# Allegro board es1_blank_output1.brd
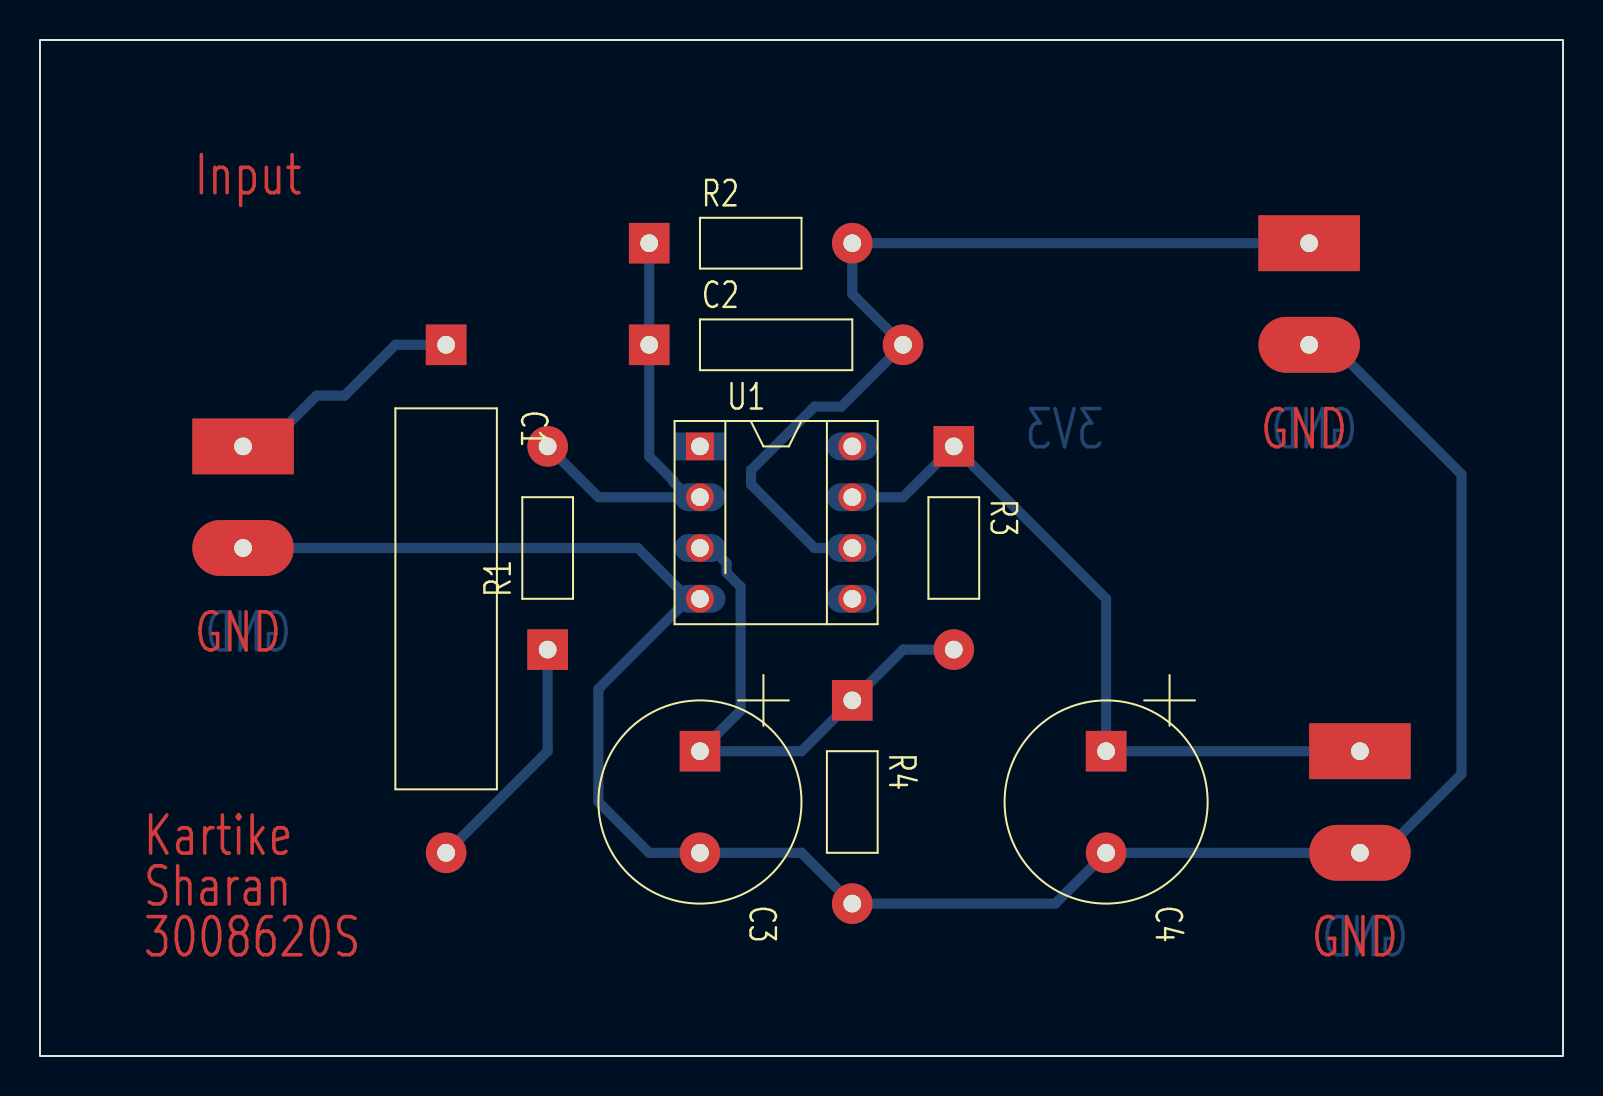
[diagram p0: board, top side]
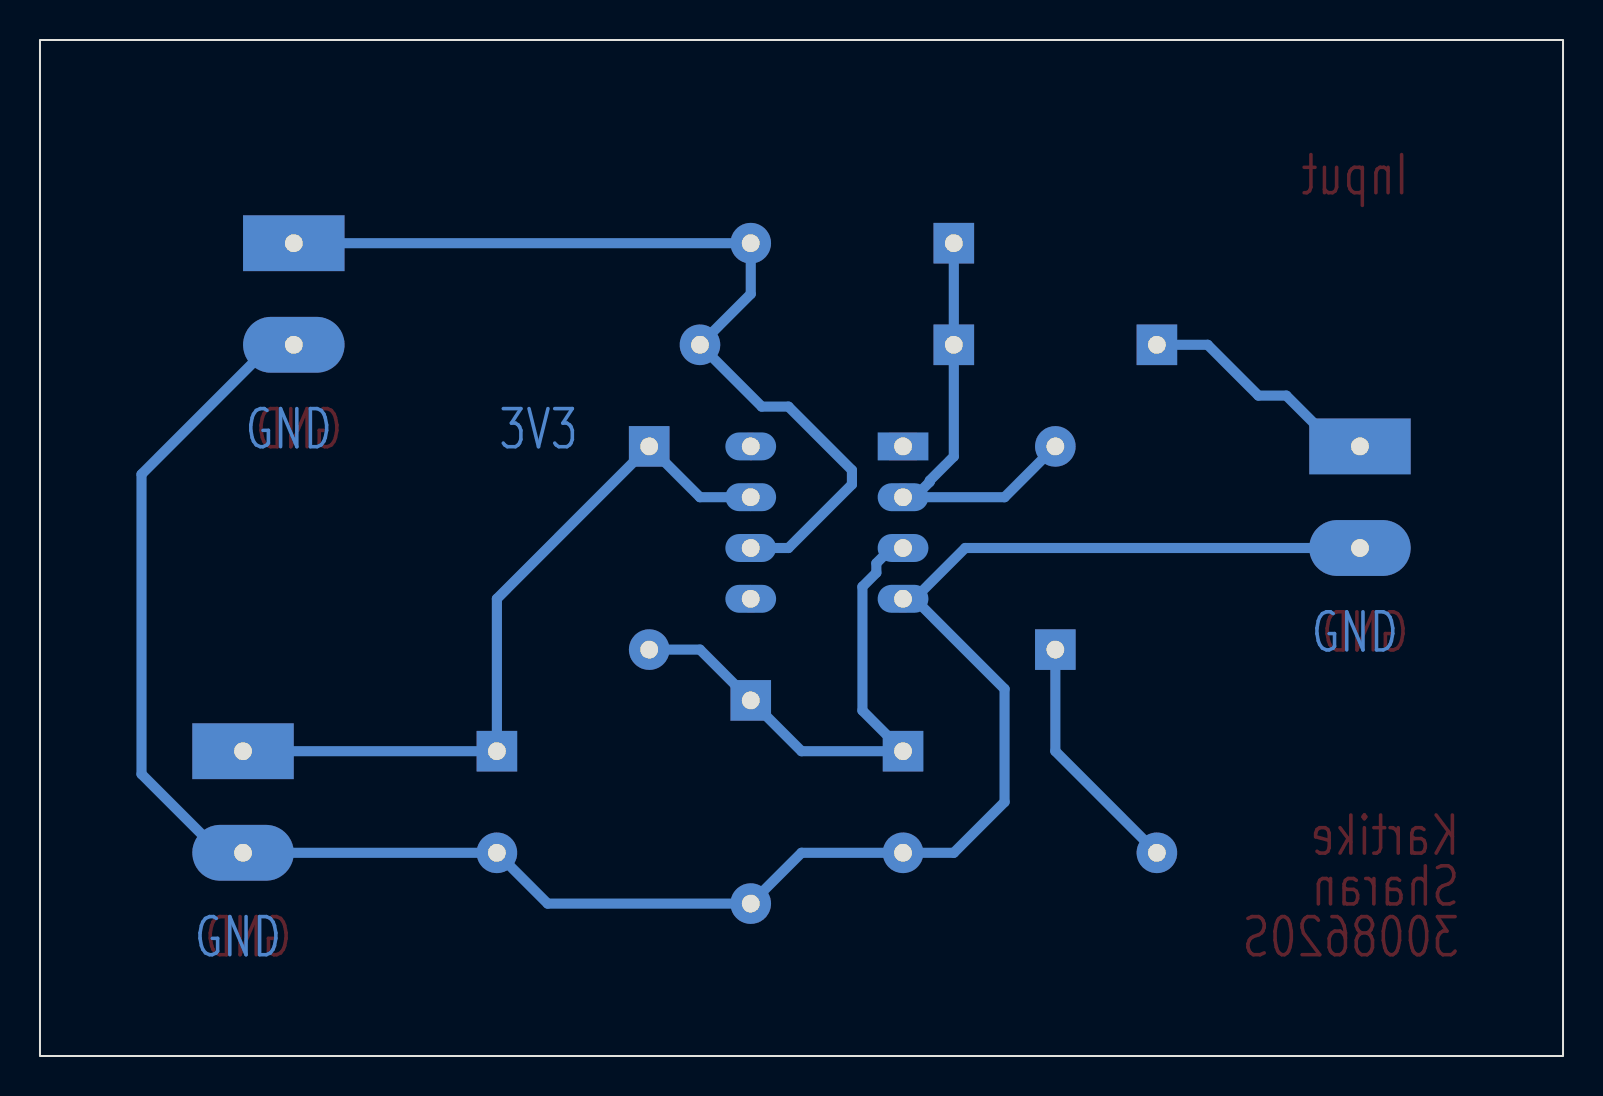
[diagram p1: board, bottom side, seen from below]

Outline 76.2 x 50.8 mm; copper layers: TOP, BOTTOM. Coordinates in mm from the lower left corner of the outline.
Outline path: rectangle 0,0 76.2,50.8

## Design rules (mm)
constraint set DEFAULT: min track width 0.508

## Placement (name value [footprint] x y rotation side)
C1  1u  [GU-RC1000]  20.32 35.56 270 top
C2  10n  [GU-RC500]  30.48 35.56 0 top
C3  4u7  [GU-CAPCYL200]  33.02 15.24 270 top
C4  4u7  [GU-CAPCYL200]  53.34 15.24 270 top
J1  CON2  [GU-TERMINAL2-200]  10.16 30.48 0 top
J2  CON2  [GU-TERMINAL2-200]  63.5 40.64 0 top
J3  CON2  [GU-TERMINAL2-200]  66.04 15.24 0 top
R1  330k  [GU-RC400]  25.4 20.32 90 top
R2  2000k  [GU-RC400]  30.48 40.64 0 top
R3  1k  [GU-RC400]  45.72 30.48 270 top
R4  1k  [GU-RC400]  40.64 17.78 270 top
U1  MCP6291  [GU-DIPSOCK8]  33.02 30.48 0 top

## Library data of the parts
C1 = CAP NP 1u
C2 = CAP NP 10n
C3 C4 = CAP POL 4u7
J1-J3 = CON2: User Part Number: TERMINAL2-200
R1 = Resistor 330k
R2 = Resistor 2000k
R3 R4 = Resistor 1k
U1 = MCP6291

## Footprints (pads in the part's own frame, mm; a bottom-side part is the same pattern mirrored in y, then rotated)
GU-CAPCYL200
  rect 2.032x2.032 hole 0.889: 1(0,0)
  round 2.032 hole 0.889: 2(5.08,0)
GU-DIPSOCK8
  rect 1.397x1.397 hole 0.889: 1(0,0)
  round 1.397 hole 0.889: 2(0,-2.54) 3(0,-5.08) 4(0,-7.62) 5(7.62,-7.62) 6(7.62,-5.08) 7(7.62,-2.54) 8(7.62,0)
GU-RC400
  rect 2.032x2.032 hole 0.889: 1(0,0)
  round 2.032 hole 0.889: 2(10.16,0)
GU-RC500
  rect 2.032x2.032 hole 0.889: 1(0,0)
  round 2.032 hole 0.889: 2(12.7,0)
GU-RC1000
  rect 2.032x2.032 hole 0.889: 1(0,0)
  round 2.032 hole 0.889: 2(25.4,0)
GU-TERMINAL2-200
  rect 5.08x2.794 hole 0.889: 1(0,0)
  oval 5.08x2.794 hole 0.889: 2(0,-5.08)

## Nets
GND: C3.2 C4.2 J1.2 J2.2 J3.2 R4.2 U1.4
VCC: C4.1 J3.1 R3.1 U1.7(VCC)
VREF: C3.1 R3.2 R4.1 U1.3
N01935: C2.1 R1.2 R2.1 U1.2
N01939: C2.2 J2.1 R2.2 U1.6
N02058: C1.1 J1.1
N02160: C1.2 R1.1

Pads without a net: U1 1 5 8

## Routing (per net, layer and track width the routed paths; a pad name or vN(x,y) marks a point on that pad's centre or on a via; arc(x,y) is an arc through that point)
GND: length 109.2
  BOTTOM w0.508: 32.45,22.86 U1.4 ; 32.45,22.86 27.94,18.35 27.94,12.7 30.48,10.16 C3.2 38.1,10.16 R4.2 50.8,7.62 C4.2 J3.2 67.18,10.16 71.12,14.1 71.12,29.08 64.64,35.56 J2.2 ; 32.45,22.86 29.91,25.4 J1.2
VCC: length 37.2
  BOTTOM w0.508: U1.7 43.18,27.94 R3.1 53.34,22.86 C4.1 J3.1
VREF: length 27
  BOTTOM w0.508: R3.2 43.18,20.32 R4.1 38.1,15.24 C3.1 35.05,17.27 35.05,23.47 34.36,24.16 34.36,24.64 33.59,25.4 U1.3
N01935: length 22.2
  BOTTOM w0.508: R2.1 C2.1 30.48,29.97 31.68,28.77 31.68,28.7 32.45,27.94 ; 32.45,27.94 27.94,27.94 R1.2 ; 32.45,27.94 U1.2
N01939: length 46.3
  BOTTOM w0.508: J2.1 R2.2 40.64,38.1 C2.2 40.09,32.47 38.75,32.47 35.58,29.29 35.58,28.58 38.75,25.4 U1.6
N02058: length 12.3
  BOTTOM w0.508: J1.1 11.3,30.48 13.84,33.02 15.24,33.02 17.78,35.56 C1.1
N02160: length 12.3
  BOTTOM w0.508: R1.1 25.4,15.24 C1.2

## Text on the board
BOTTOM: GND | 3V3
TOP: Kartike | Sharan | 3008620S | Input | GND
